# Altium PCB Thread Tension Gauge .PcbDoc (part 3 of 3)
Units mil, origin at the board's own origin, x right, y up, seen from the top; angles counter-clockwise.
Board outline 2755.91 x 2165.35 mil, 2 copper layers (Top Layer, Bottom Layer), stack 57 mil thick; 128 components, 70 nets, 387 pads, 149 vias.
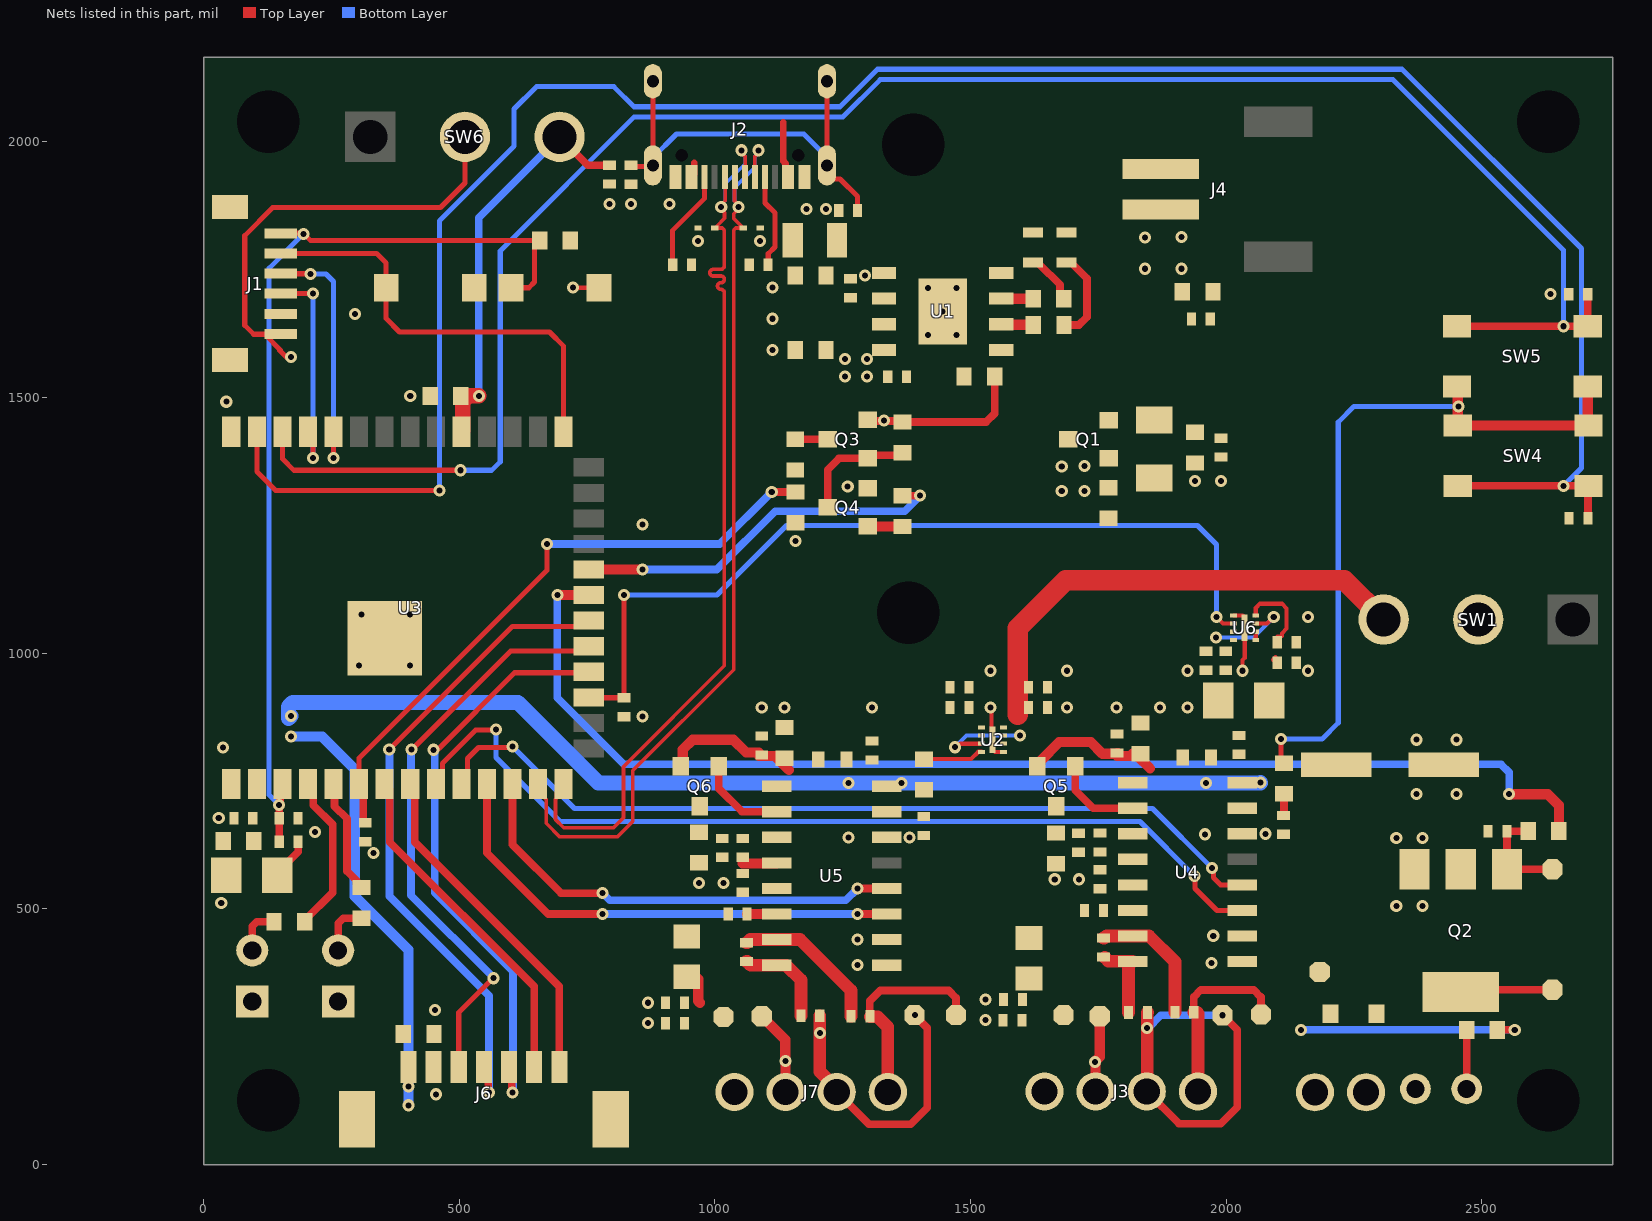
[diagram p2: the nets of this part, all layers, seen from the top]

## Via types
v1: diameter 23.62, hole 11.81, Top Layer to Bottom Layer, 149 vias

## Nets (pads, with @x,y where several pads share a name; then routed paths per layer and width w, separated by ;. In a path a pad name is that pad's centre, name@x,y a point inside that pad or via, vN(x,y) a via of type N, cw(c..) or ccw(c..) an arc to the next point about the centre after c; other vN are vias at no path point)
3V3: C8.2 C10.2 C11.2 C12.1 C18.2 C27.2 C30.2 C37.2 FB1.2 FB2.2 J1.1 J6.1 R5.2 R17.2 R22.2 SW4.1 SW4.2 SW5.1 SW5.2 SW6.2 U2.1 U2.2 U2.4 U3.2 U4.16 U5.16 | length 5329.5
  Top Layer w8: R22.2@1415.92,785.58 R22.2@1408.5,793 1500.5,793 1514.88,807.38 U2.4@1521.45,807.38
  Top Layer w10: 148.82,1592.09 161.29,1579.63 v1(170.39,1579.63) ; 149.94,1593.21 119.23,1623.91 97.87,1623.91 80.29,1641.5 80.29,1816.83 135.14,1871.68 463.15,1871.68 511,1919.53 SW6.2@511,2010 ; R17.2@2107.01,785.01 v1(2107.01,831.99)
  Top Layer w15: C10.2@144,566 144,571 184.65,611.65 R5.2@184.65,631.37
  Top Layer w20: SW5.1@2451,1521.5 2452.55,1519.95 SW4.2@2452.55,1445.56 SW4.1@2708.45,1445.56 2706.91,1447.1 SW5.2@2706.91,1521.5
  Bottom Layer w10: v1(2107.01,831.99) 2187.07,831.99 2219,863.93 2219,1452 2249.5,1482.5 v1(2454.5,1482.5)
  Bottom Layer w20: v1(170.39,837) 232.01,837 295.5,773.51 295.5,524.88 400.36,420.02 v1(400.36,116)
  Bottom Layer w30: v1@165.93,872.81 v1(170.39,877.27) ; v1@165.93,879.11 165.93,895.53 174,903.6 614.66,903.6 771.88,746.38 v1(1260.99,746.38) v1(1364.55,746.38) v1(1960.45,746.38) 2066.43,746.38 v1(2067.05,747)
  other v1: 400.36,152.54
A1+: A1+.1 J3.3 R21.1 | length 721.2
  Top Layer w15: J3.3@1844.5,143 1907.68,79.82 1988.97,79.82 2021.68,112.52 2021.68,263.57 A1+.1@1993.16,292.09
  Top Layer w25: J3.3@1844.5,143 1845.25,143.75 v1(1845.25,267.15) 1845.25,296.75 R21.1@1846,297.5
  Bottom Layer w15: v1(1845.25,267.15) 1847.19,267.15 1872.13,292.09 v1(1992.74,292.09)
A1-: A1-.1 J3.4 R20.1 | length 373.2
  Top Layer w15: R20.1@1936.5,298 1936.5,327.6 1950.47,341.57 2053.82,341.57 2067.79,327.6 A1-.1@2067.79,293.41 A1-.1@2061.06,286.67
  Top Layer w25: R20.1@1936.5,298 1942.48,298 R20.1@1945.31,295.16 ; J3.4@1944.5,143 R20.1@1944.5,290
A2+: A2+.1 J7.3 R26.1 | length 570.3
  Top Layer w15: J7.3@1238,142 1301.18,78.82 1382.47,78.82 1415.18,111.52 1415.18,267.16 1391.28,291.06 v1(1391.28,292.31)
  Top Layer w25: R26.1@1205,291 v1(1205,257.5) 1205,181.98 J7.3@1238,148.98
  Top Layer w30: J7.3@1238,142 J7.3@1238,148.98
A2-: A2-.1 J7.4 R25.1 | length 416.2
  Top Layer w15: R25.1@1303,290 1303,320 1323.5,340.5 1457.31,340.5 1471.28,326.53 A2-.1@1471.28,292.34
  Top Layer w25: R25.1@1303.89,289.11 1317.81,289.11 1338,268.93 J7.4@1338,142
AVDD1: C31.2 C32.2 L1.1 Q5.3 R18.2 U4.3
AVDD2: C38.2 C39.2 L2.2 Q6.3 R23.2 U5.3
BAT_ADC: C15.1 R9.2 R11.2 U3.6 | length 1228.7
  Top Layer w10: U3.6@304,744.15 304,794.65 671.72,1162.36 v1(671.72,1213.83)
  Top Layer w15: U3.6@304,744.15 312.18,735.97 C15.1@312.18,668.78 ; v1(1111.01,1315.51) R11.2@1157.51,1315.51
  Bottom Layer w15: v1(671.72,1213.83) 1009.33,1213.83 v1(1111.01,1315.51)
CHRG: R3.2 U1.7 | length 62.5
  Top Layer w20: U1.7@1559.76,1693.5 R3.2@1622.26,1693.5
CS_IO10: J6.5 U3.18 | length 1154.5
  Top Layer w10: v1(449.51,811.28) 452.11,813.88 460.05,813.88 608.06,961.89 751.27,961.89 U3.18@753.21,963.83
  Top Layer w15: J6.5@597.21,190.68 602.35,185.54 602.35,142.65 v1(604,141)
  Bottom Layer w15: v1(449.51,811.28) 451.16,809.63 451.16,803.53 451.61,803.08 451.61,531.35 604.97,377.99 604.97,141.97 v1(604,141)
D_CLK1: U3.9 U4.11 | length 1830.3
  Top Layer w10: U3.9@454,744.15 466.72,756.87 466.72,784.43 532.16,849.87 570.27,849.87 v1(571.72,851.32) ; v1(1938.07,564.06) 1938.93,563.21 1938.93,540.15 1982.07,497 U4.11@2031.27,497
  Bottom Layer w10: v1(571.72,851.32) 571.72,796.42 697.13,671 1831.14,671 v1(1938.07,564.06)
D_CLK2: U3.11 U5.11 | length 965.6
  Top Layer w15: U3.11@554,744.15 554,610 674,490 v1(780.42,490) ; v1(1279,490) U5.11@1335.77,490
  Bottom Layer w15: v1(780.42,490) v1(1279,490)
D_OUT1: U3.10 U4.12 | length 1701.7
  Top Layer w10: U3.10@504,744.15 516.2,756.35 516.2,794.48 537.27,815.55 601.67,815.55 v1(604,817.88) ; v1(1972.41,579.72) 1975.02,577.12 1975.02,561.21 1989.23,547 U4.12@2031.27,547
  Bottom Layer w10: v1(604,817.88) 725.39,696.48 1855.65,696.48 v1(1972.41,579.72)
D_OUT2: U3.12 U5.12 | length 904.7
  Top Layer w15: U3.12@604,744.15 604,625.92 698.92,531 v1(780.42,531) ; v1(1279,540) U5.12@1335.77,540
  Bottom Layer w15: v1(780.42,531) 794.5,516.91 1255.91,516.91 v1(1279,540)
D_RATE1: R17.1 SB1.1 U4.15 | length 43.6
  Top Layer w15: SB1.1@2107,684.25 2113,690.25 R17.1@2113,725
  Top Layer w20: U4.15@2031.27,697 U4.15@2031.52,697.25
D_RATE2: R22.1 SB2.1 U5.15
DC: J6.6 U3.7 | length 674.6
  Top Layer w15: U3.7@354,744.15 364.05,734.1 364.05,630.67 646.42,348.3 J6.6@646.42,190.68
ESP-EN: C13.2 C14.1 J1.6 R5.1 SW2.2 U3.3 | length 1916
  Top Layer w10: J1.6@150.7,1821.43 194.86,1821.43 209.29,1807 C14.1@657,1807 647,1797 647,1726.19 635.81,1715 SW2.2@600.98,1715
  Top Layer w15: R5.1@147.65,631.37 C13.2@147.65,677.36 v1(147.65,703.21) 149.3,704.86 149.3,739.45 U3.3@154,744.15
  Bottom Layer w10: v1(147.65,703.21) 128.02,722.84 128.02,1753.22 v1(194.86,1820.06)
GND: C1.1 C2.1 C3.1 C4.1 C5.1 C6.1 C7.1 C8.1 C9.1 C10.1 C11.1 C12.2 C13.1 C14.2 C15.2 C16.1 C17.2 C18.1 C19.2 C20.2 C21.1 C22.1 C23.1 C24.1 C25.1 C26.2 C27.1 C28.2 C29.1 C30.1 C31.1 C32.1 C33.2 C35.2 C36.1 C37.1 C38.1 C39.1 C40.2 C42.1 C43.1 C44.1 C46.2 D3.2 D4.2 E1-.1 E2-.1 J1.2 J1.MP1 J1.MP2 J2.A1/B12 J2.B1/A12 J3.2 J4.1 J6.2 J6.MP1 J6.MP2 J7.2 LED3.1 LED4.1 Q2.3 Q4.2 R1.2 R4.1 R6.1 R7.1 R10.1 R11.1 R14.2 R15.2 R16.1 R19.1 R24.1 R30.1 R31.1 SB1.2 SB2.2 SW2.1 SW3.1 U1.1 U1.3 U1.9 U2.5 U2.9 U3.1 U3.40 U3.41 U4.5 U4.9 U4.10 U4.14 U5.5 U5.9 U5.10 U5.14 U6.5 U6.9 | length 605.5
  Top Layer w8: v1(722.43,1715) SW2.1@773.02,1715 ; v1(1538.52,894.21) 1541.09,891.64 1541.09,832.91 U2.9@1543,831 1543,811.32 1547.43,806.89 U2.5@1564.07,806.89 ; U6.5@2014.53,1073.62 2014.6,1073.56 2032.21,1073.56 2036.09,1069.68 U6.9@2036.09,1050 2036.09,990.67 2032.01,986.59 v1(2032.01,965.82)
  Top Layer w20: E2-.1@1091.41,290.1 1137.31,244.21 1137.31,203.19 v1(1138,202.5) J7.2@1138,142 ; J3.2@1744.5,143 1744,143.5 1744,200.5 v1(1743.5,201) 1743.5,201.98 1752.49,210.97 E1-.1@1752.49,290
  other v1: 454,137.5 869,276.5 1528.78,283.01 452.11,302.63 869,316.5 1528.78,323.01 1279,390 1971.5,394.5 1279,440 1974.5,447.5 2332.5,505.5 2383.7,505.5 34.34,511.62 969,551.01 1016.84,551 1664.5,558.01 1712.34,558 332.28,609 2332.5,638.5 2383.7,638.5 1260.99,640 1380.5,640 1958.25,646 2077.03,647 217.51,650.06 29.5,677.5 2372,724.5 2450,724.5 38.09,815.5 2372,830.93 2450,830.93 858,876 1091.5,894.21 1136,894.21 1307,894.21 1688.51,894.21 1785.46,894.21 1870.5,894.21 1924,894.21 1538.52,965.82 1688.51,965.82 1924,965.82 2159.5,965.82 304.04,975.88 403.61,975.88 2159.5,1070.72 309,1076 403.61,1076 1157.51,1219.5 858,1252.03 1259.63,1326.1 1938.49,1337.12 1989.49,1337.12 44.19,1492 404,1503.5 1112.86,1593.5 1416.89,1622.5 1472,1622.5 1112.86,1654.25 296,1663.95 1445.26,1668.5 2634.47,1702.42 1416.89,1714.5 1472,1714.5 1112.86,1715 1293.22,1739.23 1841,1752.04 1912.64,1752.04 966.93,1806.61 1088.38,1806.61 1841,1813.48 1912.64,1814.41 1179.32,1868.93 1217,1868.93 793.49,1879.03 835.5,1879.03 910.91,1879.03
IO0: J1.5 SW3.2 U3.27 | length 859.7
  Top Layer w10: J1.5@150.7,1782.06 338.38,1782.06 356.96,1763.47 SW3.2@356.96,1715 356.96,1654.63 383.24,1628.35 676.24,1628.35 704,1600.59 U3.27@704,1433.13
LDO_INPUT: C6.2 C7.2 C9.2 C42.2 SW1.3 U2.3 U2.6 U2.7 U2.8 U6.3 U6.7 U6.8 | length 1315.1
  Top Layer w8: v1(1469.5,816.28) 1473.73,816.28 1480.55,823.11 1486.67,823.11 ; 1486.69,823.13 U2.3@1521.45,823.13 ; U6.3@2060.44,1057.89 2080.02,1057.89 v1(2092.85,1070.72)
  Top Layer w40: 1591.86,879.71 1591.86,1048.75 1686.25,1143.14 2230.57,1143.14 SW1.3@2307.69,1066.02
  Bottom Layer w8: v1(1469.5,816.28) 1492.26,839.05 v1(1596.41,839.05) ; v1@1980.54,1031.17 1980.71,1031 2053.13,1031 v1(2092.85,1070.72) ; SW1.3@2306.63,1064.96 SW1.3@2307.69,1066.02
  other v1: 1980,1031.17
MOT-: D2.2 J5.2 LED5.2 MN-.1 Q2.2 Q2.4 | length 181.4
  Top Layer w15: Q2.4@2458.5,337.5 2463,342 MN-.1@2638,342
MOT_CTRL: R8.1 U3.21 | length 2383.7
  Top Layer w20: v1(691.83,1113.83) U3.21@753.21,1113.83 ; v1(2553.19,724.5) 2629.08,724.5 2650.5,703.08 R8.1@2650.5,652.05
  Bottom Layer w15: v1(691.83,1113.83) 691.83,913 821.94,782.9 2537.19,782.9 2553.19,766.9 v1(2553.19,724.5)
MOT_CTRL#: MG.1 Q2.1 R8.2 R10.2 | length 204.7
  Top Layer w15: R8.2@2590.5,652.05 R10.2@2549.05,652.04 Q2.1@2549.05,577.66 MG.1@2637.95,577.66
MOT_PWR_EN: R30.2 U3.17 U6.6 | length 1681.7
  Top Layer w8: v1(1980.71,1070.72) 1993.56,1057.87 U6.6@2014.53,1057.87
  Top Layer w10: U3.17@753.21,913.83 754.05,913 R30.2@822,913 v1(822,1113.83)
  Bottom Layer w10: v1(822,1113.83) 1003.74,1113.83 1139.86,1249.95 1943.58,1249.95 1980.71,1212.82 v1(1980.71,1070.72)
MOT_SW_SENSE: C46.1 R31.2 SW6.3 U3.31 | length 803.6
  Top Layer w15: SW6.3@696.04,2010 751.47,1954.57 R31.2@793.5,1954.57
  Top Layer w30: C46.1@503,1503.5 518,1503.5 ; U3.31@504,1433.13 506.72,1435.84 506.72,1492.22 518,1503.5 ; v1(538.13,1503.5) 518,1503.5
  Bottom Layer w15: v1(538.13,1503.5) 538.13,1852.09 SW6.3@696.04,2010
MOTOR_PWR: C16.2 C19.1 C20.1 C44.2 D2.1 J5.1 MP+.1 R29.1 U6.1 U6.2 U6.4 | length 623.9
  Top Layer w8: U6.1@2057.64,1026.38 U6.2@2057.64,1042.13 ; U6.4@2057.64,1073.62 2057.64,1088.27 2066.31,1096.94 2108.76,1096.94 2118.17,1087.53 2118.17,1048.13 2108.59,1038.55 2108.59,1034 2107.09,1032.5 C16.2@2100.09,1032.5 ; C44.2@2091.17,987.43 C44.2@2096.17,992.43
  Top Layer w15: R29.1@2530,263.5 v1(2564.16,263.5)
  Bottom Layer w15: v1(2146.48,263.5) v1(2564.16,263.5)
NetC17_1: C17.1 C25.2 E1+.1 J3.1 L1.2
NetC23_2: C23.2 J2.S1 J2.S2 J2.S3 J2.S4 R16.2 | length 903.5
  Top Layer w10: R16.2@835.5,1951.83 876.06,1951.83 J2.S1@878.43,1954.2 J2.S2@878.43,2118.76 ; J2.S3@1218.98,2118.76 J2.S4@1218.98,1954.2 1218.98,1939.42 1230.73,1927.68 1244.51,1927.68 1279.03,1893.16 C23.2@1279.03,1865.94
  Bottom Layer w10: J2.S1@878.43,1954.2 878.43,1968.97 924.97,2015.51 1173.53,2015.51 1218.98,1970.05 J2.S4@1218.98,1954.2
NetC26_1: C26.1 C43.2 E2+.1 J7.1 L2.1 | length 53.1
  Top Layer w20: L2.1@963.44,366.63 967.25,362.82 967.25,319.75 970.5,316.5
NetC28_1: C28.1 C29.2 FB1.1 Q5.2 U4.1 | length 278.8
  Top Layer w20: Q5.2@1629.85,779.37 1635.99,785.51 1635.99,789.05 1673.49,826.55 1734.95,826.55 1757.78,803.71 1784,803.71 1786.5,801.21 1786.5,798.94 C29.2@1817.22,798.94 ; C28.1@1786.5,805 C28.1@1788,805 ; C29.2@1817.22,803.5 C29.2@1832,803.5 ; C29.2@1827.11,805.89 1827.11,803.5 1827.11,798.61 1850.8,774.92
NetC33_1: C33.1 U4.6
NetC34_1: C34.1 R21.2 U4.8 | length 163.9
  Top Layer w25: C34.1@1762.5,405 1769.81,397.69 1816.04,397.69 U4.8@1816.73,397 1810.5,397 1809,395.5 R21.2@1809,297.5
NetC34_2: C34.2 R20.2 U4.7 | length 260.6
  Top Layer w25: C34.2@1760,443 1761.5,443 1765.5,447 1849.11,447 1899.5,396.61 R20.2@1899.5,298
NetC35_1: C35.1 C36.2 FB2.1 Q6.2 U5.1 | length 277.4
  Top Layer w20: Q6.2@932.6,779.95 936.94,784.29 936.94,811.71 956.21,830.98 1036.06,830.98 1061.06,805.98 1085.5,805.98 1085.89,805.59 C35.1@1085.89,799.13 ; C35.1@1085.89,798.89 1117.48,798.89 1144.63,771.75
NetC40_1: C40.1 U5.6 | length 58.4
  Top Layer w20: C40.1@1062.84,490 U5.6@1121.23,490
NetC41_1: C41.1 R26.2 U5.8 | length 191.4
  Top Layer w25: C41.1@1061.5,397 1063,397 1070,390 U5.8@1121.23,390 1139,390 1168,361 R26.2@1168,291
NetC41_2: C41.2 R25.2 U5.7 | length 298.7
  Top Layer w25: C41.2@1061.5,434 1063,434 1069,440 1166.5,440 1266,340.5 R25.2@1266,290
NetJ2_A5: J2.A5 R14.1 | length 185.6
  Top Layer w10: J2.A5@1097.92,1931.75 1097.92,1880.85 1117.34,1861.43 1117.34,1794.66 1104.13,1781.45 1104.13,1760.07 R14.1@1103.86,1759.81
NetJ2_B5: J2.B5 R15.1 | length 199.8
  Top Layer w10: R15.1@917.22,1757.85 917.22,1827.15 979.81,1889.74 J2.B5@979.81,1931.75
NetLED1_2: LED1.2 R3.1 | length 101.5
  Top Layer w15: LED1.2@1622.01,1764.27 1631.85,1764.27 1634.19,1761.92 1634.19,1761.21 1674.92,1720.48 1674.92,1700.84 R3.1@1682.26,1693.5
NetLED2_2: LED2.2 R2.1 | length 180
  Top Layer w15: R2.1@1682.76,1642 1711.85,1642 1727.45,1657.59 1727.45,1733.14 1699.94,1760.64 1699.94,1761.92 1697.6,1764.27 LED2.2@1687.76,1764.27
NetLED3_2: LED3.2 R27.2 | length 103
  Top Layer w15: LED3.2@263,419 263,471.87 273.18,482.05 R27.2@308.95,482.05
NetLED4_2: LED4.2 R28.2 | length 93.4
  Top Layer w15: LED4.2@95,419 95,466.21 103.79,475 R28.2@137.5,475
NetLED5_1: LED5.1 R29.2 | length 115.5
  Top Layer w15: LED5.1@2470,148 R29.2@2470,263.5
NetQ3_1: Q3.1 Q4.3 R12.2 | length 234.2
  Top Layer w15: Q4.3@1220.26,1285.5 1220.26,1359.18 1242.7,1381.62 Q3.1@1299,1381.62 1304.93,1387.55 1362.13,1387.55 R12.2@1367,1392.43
NetQ4_1: Q4.1 R13.2 | length 68
  Top Layer w20: Q4.1@1299,1248.1 R13.2@1367,1248.1
NetQ5_1: Q5.1 U4.2 | length 163.9
  Top Layer w15: Q5.1@1704.65,769.5 1704.65,732.33 1739.98,697 U4.2@1816.73,697
NetQ6_1: Q6.1 U5.2 | length 176.5
  Top Layer w15: Q6.1@1007.4,779.37 1007.4,735.6 1053,690 U5.2@1121.23,690
NetR1_1: R1.1 U1.2
RES: J6.7 U3.8 | length 674.3
  Top Layer w15: U3.8@404,744.15 413,735.15 413,630.94 695.63,348.3 J6.7@695.63,190.68
RXD0: J1.4 U3.36 | length 496.9
  Top Layer w10: J1.4@150.7,1742.69 151.16,1742.23 208.83,1742.23 v1(209.29,1741.77) ; v1(254,1381.75) U3.36@254,1433.13
  Bottom Layer w10: v1(209.29,1741.77) 239.4,1741.77 254,1727.17 v1@254,1391.39
SCL_CLK_IO12: J6.4 U3.20 | length 1299.5
  Top Layer w10: v1(362.97,811.93) 482.13,931.09 482.13,931.15 603.74,1052.76 742.14,1052.76 U3.20@753.21,1063.83
  Top Layer w15: J6.4@548,190.68 556.24,182.43 556.24,145.09 558,143.33 v1(558,141)
  Bottom Layer w15: v1@363.43,811.47 363.43,524.57 558,330 v1(558,141)
SDA_DIN_IO11: J6.3 U3.19 | length 1146.9
  Top Layer w10: v1@407.58,811.63 600.47,1004.52 743.89,1004.52 U3.19@753.21,1013.83 ; J6.3@498.78,190.68 498.78,297.28 565.99,364.49 v1(567.11,364.49)
  Bottom Layer w15: v1(406.79,811.63) 405.36,810.19 405.36,526.9 567.11,365.14 v1(567.11,364.49)
STDBY: R2.2 U1.6 | length 63.6
  Top Layer w20: U1.6@1559.76,1643.5 1560.51,1642.75 1622.01,1642.75 R2.2@1622.76,1642
TARE_BUTTON: R6.2 SW4.3 SW4.4 U3.39 | length 4351.1
  Top Layer w10: U3.39@104,1433.13 104,1355.52 141.02,1318.5 v1(461,1318.5)
  Top Layer w15: SW4.3@2452.55,1327.44 v1(2659.5,1327.44) SW4.4@2708.45,1327.44 ; R6.2@2707.5,1264 SW4.4@2707.5,1326.49
  Bottom Layer w10: v1(461,1318.5) 461,1845.81 607.02,1991.83 607.02,2064.52 650.71,2108.21 802.05,2108.21 841.42,2068.84 1244.48,2068.84 1317.97,2142.33 2343.71,2142.33 2694.5,1791.54 2694.5,1362.44 v1(2659.5,1327.44)
TXD0: J1.3 U3.37 | length 439.7
  Top Layer w10: J1.3@150.7,1703.32 v1(213.64,1703.32) ; U3.37@204,1433.13 213.85,1423.28 v1@213.85,1381.96
  Bottom Layer w10: v1(213.64,1381.75) v1(213.64,1703.32)
UNIT_LED1: R27.1 U3.5 | length 226.3
  Top Layer w15: U3.5@254,744.15 255.74,742.41 255.74,700.91 280.4,676.24 280.4,573.43 298.95,554.88 298.95,549.55 306.45,542.05 R27.1@308.95,542.05
UNIT_LED2: R28.1 U3.4 | length 311.8
  Top Layer w15: R28.1@197.5,475 197.5,477.5 252.21,532.21 252.21,665.14 214.14,703.21 214.14,734.01 U3.4@204,744.15
UNIT_TOGGLE: R7.2 SW5.3 SW5.4 U3.38 | length 3730.7
  Top Layer w10: U3.38@154,1433.13 154,1380.29 176.29,1358 v1(502.5,1358)
  Top Layer w15: SW5.4@2451,1639.61 v1(2659.5,1639.61) SW5.3@2706.91,1639.61 R7.2@2706.91,1702.1
  Bottom Layer w10: v1(502.5,1358) 563.28,1358 580,1374.72 580,1786.99 842.14,2049.13 1250.46,2049.13 1323.18,2121.84 2325.93,2121.84 2659.5,1788.27 v1(2659.5,1639.61)
USB_D_N: D4.1 J2.A7 J2.B7 U3.13 | length 1833.9
  Top Layer w7: U3.13@654,744.15 668.22,729.93 668.22,715.7 669.9,714.02 669.9,667.47 696.57,640.8 809.07,640.8 839.36,671.08 839.36,770.62 1036.58,967.84 1036.58,1827.71 1040.68,1831.81 D4.1@1055.31,1831.81 ; J2.A7@1038.86,1931.75 1038.12,1931.01 1038.12,1885.08 1045.83,1877.37 v1(1045.83,1872.87) 1045.83,1868.93 1036.81,1859.91 1036.81,1850.31 D4.1@1051.72,1835.4 ; J2.B7@1078.23,1931.75 1077.49,1932.5 1077.49,1971.56 1085.2,1979.27 v1(1085.2,1983.76)
  Bottom Layer w7: v1(1045.83,1872.87) 1045.83,1877.37 1038.12,1885.08 1038.12,1910.78 1077.49,1950.15 1077.49,1971.56 1085.2,1979.27 v1(1085.2,1983.76)
USB_D_P: D3.1 J2.A6 J2.B6 U3.14 | length 1833.9
  Top Layer w7: U3.14@704,744.15 689.78,729.93 689.78,715.7 688.1,714.02 688.1,675.01 704.11,659 801.53,659 821.16,678.62 821.16,778.16 1018.38,975.38 1018.38,1686.58 1018.38,1704.85 ccw(c1011.38,1704.85) 1011.38,1711.85 ; D3.1@999.65,1831.81 1014.28,1831.81 1018.38,1827.71 1018.38,1774.35 1018.38,1757.85 cw(c1011.38,1757.85) 1011.38,1750.85 996.4,1750.85 ccw(c996.4,1744.35) 996.4,1737.85 1011.88,1737.85 cw(c1011.88,1731.35) 1011.88,1724.85 1011.37,1724.85 ccw(c1011.37,1718.35) 1011.37,1711.85 ; D3.1@1003.23,1835.4 1018.61,1850.78 1018.61,1861.97 1012.21,1868.37 v1(1012.21,1872.87) 1012.21,1877.37 1019.92,1885.08 1019.92,1931.01 J2.B6@1019.18,1931.75 ; v1(1051.58,1983.76) 1051.58,1979.27 1059.29,1971.56 1059.29,1932.5 J2.A6@1058.55,1931.75
  Bottom Layer w7: v1(1012.21,1872.87) 1012.21,1877.37 1019.92,1885.08 1019.92,1918.32 1059.29,1957.69 1059.29,1971.56 1051.58,1979.27 v1(1051.58,1983.76)
V_MON: Q3.3 R9.1 | length 63.5
  Top Layer w15: R9.1@1157.26,1418.77 Q3.3@1220,1418.77
  Top Layer w20: R9.1@1157.01,1418.51 R9.1@1157.26,1418.77 ; Q3.3@1220,1418.77 Q3.3@1220.26,1419.02
V_OR: C4.2 C5.2 D1.1 Q1.2 SW1.2
VBATT: C1.2 C22.2 C24.2 J4.2 Q1.3 Q3.2 R12.1 U1.5 | length 328.6
  Top Layer w15: Q3.2@1299,1456.43 1301,1454.43 1330.4,1454.43 1365,1454.43 R12.1@1367,1452.43 1530.49,1452.43 1547,1468.94 C1.2@1547,1541
  other v1: 1330.4,1455.24
VBUS: F1.1 J2.A4/B9 J2.B4/A9 | length 140.2
  Top Layer w13: J2.B4/A9@954.38,1931.92 959.53,1937.07 959.53,1959 ; 1133.78,2038.86 1133.78,1962.78 1136.01,1960.55 1136.01,1959.76 1137.88,1957.89 1137.88,1937.07 J2.A4/B9@1143.19,1931.75
VFB1: R18.1 R19.2 U4.4
VFB2: R23.1 R24.2 U5.4 | length 67.1
  Top Layer w20: 1054.5,589 1120.23,589 U5.4@1121.23,590
VMON_EN: R13.1 U3.22 | length 742
  Top Layer w15: R13.1@1367.26,1308.36 1367.39,1308.23 1400.92,1308.23 v1(1401.04,1308.36)
  Top Layer w20: U3.22@753.21,1163.83 v1(858,1163.83) ; R13.1@1367,1308.1 R13.1@1367.26,1308.36
  Bottom Layer w15: v1(858,1163.83) 1003.4,1163.83 1117.67,1278.1 1370.79,1278.1 v1(1401.04,1308.36)
VUSB: C2.2 C3.2 C21.2 D1.2 F1.2 LED1.1 LED2.1 Q1.1 R4.2 U1.4 U1.8
  other v1: 1678.2,1317.59 1723.03,1317.59 1678.2,1365.59 1723.03,1366.29 1254.17,1541.44 1297.61,1541.44 1254.17,1575.8 1297.61,1575.8
pads on no net: J2.A8 J2.B8 J2.MH J4.3 J4.4 SW1.1 SW6.1 U3.15 U3.16 U3.23 U3.24 U3.25 U3.26 U3.28 U3.29 U3.30 U3.32 U3.33 U3.34 U3.35 U4.13 U5.13

## Polygon pours and split planes (outlines as drawn)
GND on Top Layer "GND_L01_P013" (solid, remove dead copper, pour order 13): 0,0 0,2165.35 2755.91,2165.35 2755.91,0
VBUS on Top Layer "NONET_L-01_P-001" (solid, pour order 11): 988.86,2005.5 966.93,1983.57 966.93,1908.13 941.5,1908.13 941.5,2001.01 941.5,2065.63 1155.49,2065.63 1155.49,2001.13 1155.49,1867.07 1131.43,1867.07 1131.43,1986.07 1112.01,2005.5
GND on Bottom Layer "GND_L02_P012" (solid, remove dead copper, pour order 12): 0,0 0,2165.35 2755.91,2165.35 2755.91,0

## Other copper
Top Layer:
  rectangle net NetC26_1: 926.27,82.94 1034.9,390.91
  rectangle net D_RATE2: 1307,679 1426,701
  rectangle net D_RATE2: 1391,671.79 1426,748
  rectangle net D_RATE1: 2095.5,674 2130.5,740
  rectangle net LDO_INPUT: 1911,994.34 1952.59,1155.05
  rectangle net 3V3: 1339.91,839.05 1468.66,946
  rectangle net LDO_INPUT: 1560.33,819.32 1622.29,946
  region net V_OR: 2355.55,1178.11 2355.55,1491.24 2250.27,1491.24 2250.27,1178.11
  rectangle net V_OR: 2250.27,1178.11 2554.5,1274.94
  rectangle net V_OR: 1751.89,1410.72 2328,1491.24
  rectangle net VUSB: 1751.89,1302.36 1788.82,1397.13
  rectangle net VUSB: 1655.68,1302.36 1894.43,1386.96
  rectangle net VBATT: 1655.68,1402.25 1730.94,1608.24
  rectangle net VUSB: 1536.14,1804 1707.44,1841.5
  rectangle net MOT-: 2323.26,298.13 2533.3,376.87
  rectangle net MOT-: 2417,298.13 2501.08,617.03
  rectangle net 3V3: 89,531 174,601
  rectangle net AVDD1: 1588.13,419.25 1637.75,663.5
  rectangle net MOTOR_PWR: 2128,80 2219.25,350.46
  rectangle net 3V3: 1946.01,732.09 2081.21,812.75
  rectangle net 3V3: 2063.63,757.6 2128.72,813.5
  rectangle net BAT_ADC: 1139.51,1300.51 1175.01,1373.51
  rectangle net D_RATE1: 2002.5,683 2125.28,708
  rectangle net D_RATE1: 2096.44,674 2124.25,738.62
  rectangle net VUSB: 1195.32,1775.5 1583.39,1842.48
  rectangle net AVDD2: 900.5,423.5 971.07,468.99
  rectangle net VFB2: 1042,560.5 1067,610
  rectangle net VFB1: 1740.5,567.5 1765.5,620.5
  rectangle net V_OR: 2408.84,1008.5 2554.5,1226
  region net LDO_INPUT: 2018.28,1043.69 1911,1043.69 1911,994.34 2018.28,994.34
  rectangle net 3V3: 86.5,815.5 195.1,899
  rectangle net 3V3: 375.5,98 419,273
  rectangle net 3V3: 114.23,1564.63 189,1634.42
  rectangle net 3V3: 1339.91,761.5 1429.5,871.46
  rectangle net VBUS: 1131.43,1774.35 1155.59,1928.6
  rectangle net 3V3: 1339.91,838.1 1525.94,871.46
  rectangle net NetC17_1: 1587.71,101.5 1692.74,387.15
  rectangle net VBATT: 1959,1518 2022.5,1998.05
  rectangle net MOTOR_PWR: 2053.68,872 2297.5,942.67
  rectangle net MOTOR_PWR: 2146.48,334.27 2297.5,942.67
  rectangle net 3V3: 86.5,531 124,837
  rectangle net VBATT: 1527,1518 2022.5,1608.5
  rectangle net VBATT: 1796.56,1919.05 2022.5,1998.05
  rectangle net GND: 1796.56,1836.55 1946.16,1893.79
  rectangle net VUSB: 1195.32,1569.5 1238.5,1842.48
  rectangle net NetR1_1: 1252.5,1681.69 1354.37,1705.31
  rectangle net VUSB: 1195.66,1523.5 1356.31,1611.71
  rectangle net MOT-: 2233.8,80 2424.73,314.5
  rectangle net VUSB: 1536.14,1728.24 1583.39,1841.5
  region net MOTOR_PWR: 2112.7,1042.08 2053.82,1042.08 2053.82,872.13 2112.7,872.13
  rectangle net NetC28_1: 1774,732.34 1927.6,817.51
  rectangle net NetC33_1: 1750.99,486 1845.5,509.5
  rectangle net VFB1: 1740.5,585.64 1845.5,608
  rectangle net AVDD1: 1588.13,633.79 1845.5,665.11
  rectangle net AVDD1: 1651.11,633.5 1683.55,718.74
  rectangle net AVDD2: 948.74,629 992,718.74
  rectangle net AVDD2: 900.5,423.5 939.45,660
  rectangle net NetC26_1: 991,82.5 1086.5,248.3
  rectangle net AVDD2: 900.5,629 1157,660
  rectangle net 3V3: 1245.25,718 1375.72,807.86
  rectangle net NetC35_1: 1075.5,725.5 1213.75,818
Bottom Layer:
  rectangle net VUSB: 1656,1298 1748.31,1593.55
  rectangle net VUSB: 1201.34,1498.6 1748.31,1593.55
  rectangle net 3V3: 147,793.1 189,1594.39
Multi-Layer:
  pour cut-out: 2511.81,125.98 ccw(c2629.92,125.98) 2629.92,7.87 ccw(c2629.92,125.98) 2748.03,125.98 ccw(c2629.92,125.98) 2629.92,244.09 ccw(c2629.92,125.98)
  pour cut-out: 7.87,125.98 ccw(c125.98,125.98) 125.98,7.87 ccw(c125.98,125.98) 244.09,125.98 ccw(c125.98,125.98) 125.98,244.09 ccw(c125.98,125.98)
  pour cut-out: 7.87,2039.37 ccw(c125.98,2039.37) 125.98,1921.26 ccw(c125.98,2039.37) 244.09,2039.37 ccw(c125.98,2039.37) 125.98,2157.48 ccw(c125.98,2039.37)
  pour cut-out: 1269.84,1994.37 ccw(c1387.95,1994.37) 1387.95,1876.26 ccw(c1387.95,1994.37) 1506.06,1994.37 ccw(c1387.95,1994.37) 1387.95,2112.48 ccw(c1387.95,1994.37)
  pour cut-out: 2511.81,2039.37 ccw(c2629.92,2039.37) 2629.92,1921.26 ccw(c2629.92,2039.37) 2748.03,2039.37 ccw(c2629.92,2039.37) 2629.92,2157.48 ccw(c2629.92,2039.37)
  pour cut-out: 1259.84,1079.5 ccw(c1377.95,1079.5) 1377.95,961.39 ccw(c1377.95,1079.5) 1496.06,1079.5 ccw(c1377.95,1079.5) 1377.95,1197.61 ccw(c1377.95,1079.5)

## Silkscreen, mask and mechanical layers (free items; w line width, h text height)
Top Overlay:
  lines w5: 108.59,677.36 135.15,677.36 ; 118.91,631.37 134.63,631.37 ; 215.5,484 233.01,484 233.01,503.88 ; 543.55,613.01 586.03,613.01 ; 543.55,659 586.38,659 ; 677.59,682.28 586.38,682.28 586.38,659 ; 680.46,581.54 586.38,581.54 586.38,659 ; 912.09,520 1038.5,520 ; 1280.1,870.03 1291,859.13 1291,841 ; 1570.64,527 1738.1,527 ; 1802.62,1041.85 1802.62,1003.11 1896.75,1003.11 ; 1896.75,1042.13 1896.75,1003.11 ; 1942.21,1003.11 1896.75,1003.11
  text "BAT+" at 2185.29,1939.8 h60
  text "CHRG" at 1651.93,1853.43 h60 r90
  text "FULL" at 1717.32,1852.8 h60 r90
  text "BAT-" at 2174.97,1838.19 h60
  text "MOTOR" at 263.85,1824.21 h60
  text "UNIT" at 2429.44,1695.76 h60
  text "BOOT" at 368,1599.8 h60
  text "RST" at 605.16,1587.08 h60
  text "TARE" at 2430.99,1231.14 h60
  text "PWR / SWITCH" at 2488.32,822.5 h60
  text "E+" at 987.97,327.74 h50
  text "A+" at 1362.18,327.74 h50
  text "A-" at 1447.88,327.74 h50
  text "E+" at 1656.54,327.74 h50
  text "E-" at 1731.96,327.74 h50
  text "A+" at 1964.51,327.74 h50
  text "A-" at 2044.39,327.74 h50
  text "E-" at 1063,322.74 h50
  text "OLED" at 477.16,233.43 h60
Board Outline:
  the board outline again, w10
Fabrication:
  drawing of 191 lines, arcs and shapes, not listed
  text "Layer" at 3322.5,2652 h60
  text "Name" at 3732.41,2652 h60
  text "Material" at 4662.16,2652 h60
  text "Thickness" at 5521.92,2652 h60
  text "Constant" at 6171.76,2652 h60
  text "Board Layer Stack" at 6741.62,2652 h60
  text "Top Overlay" at 3732.41,2532 h60
  text "Top Solder" at 3732.41,2412 h60
  text "Solder Resist" at 4662.16,2412 h60
  text "0.076mm" at 5521.92,2412 h60
  text "3.5" at 6171.76,2412 h60
  text "1" at 3322.5,2292 h60
  text "Top Layer" at 3732.41,2292 h60
  text "0.254mm" at 5521.92,2292 h60
  text "Dielectric 1" at 3732.41,2172 h60
  text "FR-4" at 4662.16,2172 h60
  text "0.940mm" at 5521.92,2172 h60
  text "4.8" at 6171.76,2172 h60
  text "2" at 3322.5,2052 h60
  text "Bottom Layer" at 3732.41,2052 h60
  text "0.254mm" at 5521.92,2052 h60
  text "Bottom Solder" at 3732.41,1932 h60
  text "Solder Resist" at 4662.16,1932 h60
  text "0.076mm" at 5521.92,1932 h60
  text "3.5" at 6171.76,1932 h60
  text "Bottom Overlay" at 3732.41,1812 h60
  text "Total board thickness:" at 3322.5,1692 h60
  text "1.600mm" at 5521.92,1692 h60
Drill Drawing:
  circle w10: c92.62,3857.27 r33.33
  lines w10: 59.29,3223.94 125.96,3223.94 125.96,3290.61 59.29,3290.61 59.29,3223.94 ; 59.29,3390.61 75.96,3390.61 75.96,3373.94 109.29,3373.94 109.29,3390.61 125.96,3390.61 125.96,3423.94 109.29,3423.94 109.29,3440.61 75.96,3440.61 75.96,3423.94 59.29,3423.94 59.29,3390.61 ; 59.29,3557.27 92.62,3523.94 125.96,3557.27 92.62,3590.61 59.29,3557.27 ; 59.29,3673.94 125.96,3673.94 125.96,3740.61 59.29,3740.61 59.29,3673.94 ; 59.29,3973.94 59.29,3990.61 75.96,4007.27 59.29,4023.94 59.29,4040.61 75.96,4040.61 92.62,4023.94 109.29,4040.61 125.96,4040.61 125.96,4023.94 109.29,4007.27 125.96,3990.61 125.96,3973.94 109.29,3973.94 92.62,3990.61 75.96,3973.94 59.29,3973.94 ; 59.29,4123.94 92.62,4140.61 125.96,4123.94 109.29,4157.27 125.96,4190.61 92.62,4173.94 59.29,4190.61 75.96,4157.27 59.29,4123.94 ; 59.29,4290.61 75.96,4290.61 92.62,4273.94 109.29,4290.61 125.96,4290.61 109.29,4307.27 125.96,4323.94 109.29,4323.94 92.62,4340.61 75.96,4323.94 59.29,4323.94 75.96,4307.27 59.29,4290.61 ; 59.29,4490.61 125.96,4490.61 92.62,4423.94 59.29,4490.61 ; 72.62,3237.27 112.62,3237.27 112.62,3277.27 72.62,3277.27 72.62,3237.27
  lines w15: -0.5,3178.94 7779.35,3178.94 ; -0.5,4528.94 7779.35,4528.94 ; 550.38,3028.94 550.38,4678.94 ; 1140.22,3028.94 1140.22,4678.94 ; 2279.89,3028.94 2279.89,4678.94 ; 2785.76,3028.94 2785.76,4678.94 ; 3519.56,3028.94 3519.56,4678.94 ; 5019.12,3028.94 5019.12,4678.94 ; 5608.96,3028.94 5608.96,4678.94 ; 6354.76,3028.94 6354.76,4678.94 ; -0.5,3028.94 7779.35,3028.94 7779.35,4678.94 -0.5,4678.94 -0.5,3028.94
  text "Symbol" at 89.5,4573.94 h72
  text "Count" at 595.38,4573.94 h72
  text "Hole Size" at 1185.22,4573.94 h72
  text "Plated" at 2324.89,4573.94 h72
  text "Hole Type" at 2830.76,4573.94 h72
  text "Drill Layer Pair" at 3564.56,4573.94 h72
  text "Via/Pad" at 5064.12,4573.94 h72
  text "Pad Shape" at 5653.96,4573.94 h72
  text "Template" at 6399.76,4573.94 h72
  text "2" at 595.38,4423.94 h60
  text "23.62mil (0.600mm)" at 1185.22,4423.94 h60
  text "PTH" at 2324.89,4423.94 h60
  text "Slot" at 2830.76,4423.94 h60
  text "Top Layer - Bottom Layer" at 3564.56,4423.94 h60
  text "Pad" at 5064.12,4423.94 h60
  text "Rounded" at 5653.96,4423.94 h60
  text "r90_170h60_140r100" at 6399.76,4423.94 h60
  text "2" at 595.38,4273.94 h60
  text "23.62mil (0.600mm)" at 1185.22,4273.94 h60
  text "PTH" at 2324.89,4273.94 h60
  text "Slot" at 2830.76,4273.94 h60
  text "Top Layer - Bottom Layer" at 3564.56,4273.94 h60
  text "Pad" at 5064.12,4273.94 h60
  text "Rounded" at 5653.96,4273.94 h60
  text "(Mixed)" at 6399.76,4273.94 h60
  text "2" at 595.38,4123.94 h60
  text "24.41mil (0.620mm)" at 1185.22,4123.94 h60
  text "NPTH" at 2324.89,4123.94 h60
  text "Round" at 2830.76,4123.94 h60
  text "Top Layer - Bottom Layer" at 3564.56,4123.94 h60
  text "Pad" at 5064.12,4123.94 h60
  text "Rounded" at 5653.96,4123.94 h60
  text "c0hn62" at 6399.76,4123.94 h60
  text "2" at 595.38,3973.94 h60
  text "35.43mil (0.900mm)" at 1185.22,3973.94 h60
  text "PTH" at 2324.89,3973.94 h60
  text "Round" at 2830.76,3973.94 h60
  text "Top Layer - Bottom Layer" at 3564.56,3973.94 h60
  text "Pad" at 5064.12,3973.94 h60
  text "Rounded" at 5653.96,3973.94 h60
  text "c152h90o0_0m157mx157p0" at 6399.76,3973.94 h60
  text "4" at 595.38,3823.94 h60
  text "35.43mil (0.900mm)" at 1185.22,3823.94 h60
  text "PTH" at 2324.89,3823.94 h60
  text "Round" at 2830.76,3823.94 h60
  text "Top Layer - Bottom Layer" at 3564.56,3823.94 h60
  text "Pad" at 5064.12,3823.94 h60
  text "(Mixed)" at 5653.96,3823.94 h60
  text "(Mixed)" at 6399.76,3823.94 h60
  text "6" at 595.38,3673.94 h60
  text "66.93mil (1.700mm)" at 1185.22,3673.94 h60
  text "PTH" at 2324.89,3673.94 h60
  text "Round" at 2830.76,3673.94 h60
  text "Top Layer - Bottom Layer" at 3564.56,3673.94 h60
  text "Pad" at 5064.12,3673.94 h60
  text "(Mixed)" at 5653.96,3673.94 h60
  text "(Mixed)" at 6399.76,3673.94 h60
  text "6" at 595.38,3523.94 h60
  text "122.05mil (3.100mm)" at 1185.22,3523.94 h60
  text "NPTH" at 2324.89,3523.94 h60
  text "Round" at 2830.76,3523.94 h60
  text "Top Layer - Bottom Layer" at 3564.56,3523.94 h60
  text "Pad" at 5064.12,3523.94 h60
  text "Rounded" at 5653.96,3523.94 h60
  text "c0hn310m5mx5p0" at 6399.76,3523.94 h60
  text "10" at 595.38,3373.94 h60
  text "51.18mil (1.300mm)" at 1185.22,3373.94 h60
  text "PTH" at 2324.89,3373.94 h60
  text "Round" at 2830.76,3373.94 h60
  text "Top Layer - Bottom Layer" at 3564.56,3373.94 h60
  text "Pad" at 5064.12,3373.94 h60
  text "Rounded" at 5653.96,3373.94 h60
  text "c190h130m195mx195p0" at 6399.76,3373.94 h60
  text "148" at 595.38,3223.94 h60
  text "11.81mil (0.300mm)" at 1185.22,3223.94 h60
  text "PTH" at 2324.89,3223.94 h60
  text "Round" at 2830.76,3223.94 h60
  text "Top Layer - Bottom Layer" at 3564.56,3223.94 h60
  text "Via" at 5064.12,3223.94 h60
  text "Rounded" at 5653.96,3223.94 h60
  text "v60h30" at 6399.76,3223.94 h60
  text "182 Total" at 595.38,3073.94 h60
  text "Slot definitions :" at 89.5,2928.97 h60
  text "Routed Path Length" at 1122.19,2928.97 h60
  text "= Calculated from tool start centre position to tool end centre position." at 2224.86,2928.97 h60
  text "Hole Length" at 1122.19,2828.99 h60
  text "= Routed Path Length + Tool Size = Slot length as defined in the PCB layout" at 1814.99,2828.99 h60

## Dimensions
2629.92,2039.37 to 2629.92,125.98 on Dimension
125.98,2039.37 to 2629.92,2039.37 on Dimension
2755.91,2165.35 to 2755.91,0 on Dimension
0,2165.35 to 2755.91,2165.35 on Dimension

## Text inside footprints (layer, text, board x,y; h text height)
J2: Mechanical 13 "PCB Edge" at 1093.39,2127.92 h40 r180
J6: Top Overlay "PCB Edge" at 477.96,13.26 h31.5